# Altium PCB TSE_sensor_commutation_board.PcbDoc
Units mm, origin at the board's own origin, x right, y up, seen from the top; angles counter-clockwise.
Board outline 133.4 x 157 mm, 2 copper layers (Top Layer, Bottom Layer), stack 1.47 mm thick; 54 components, 33 nets, 206 pads, 75 vias.
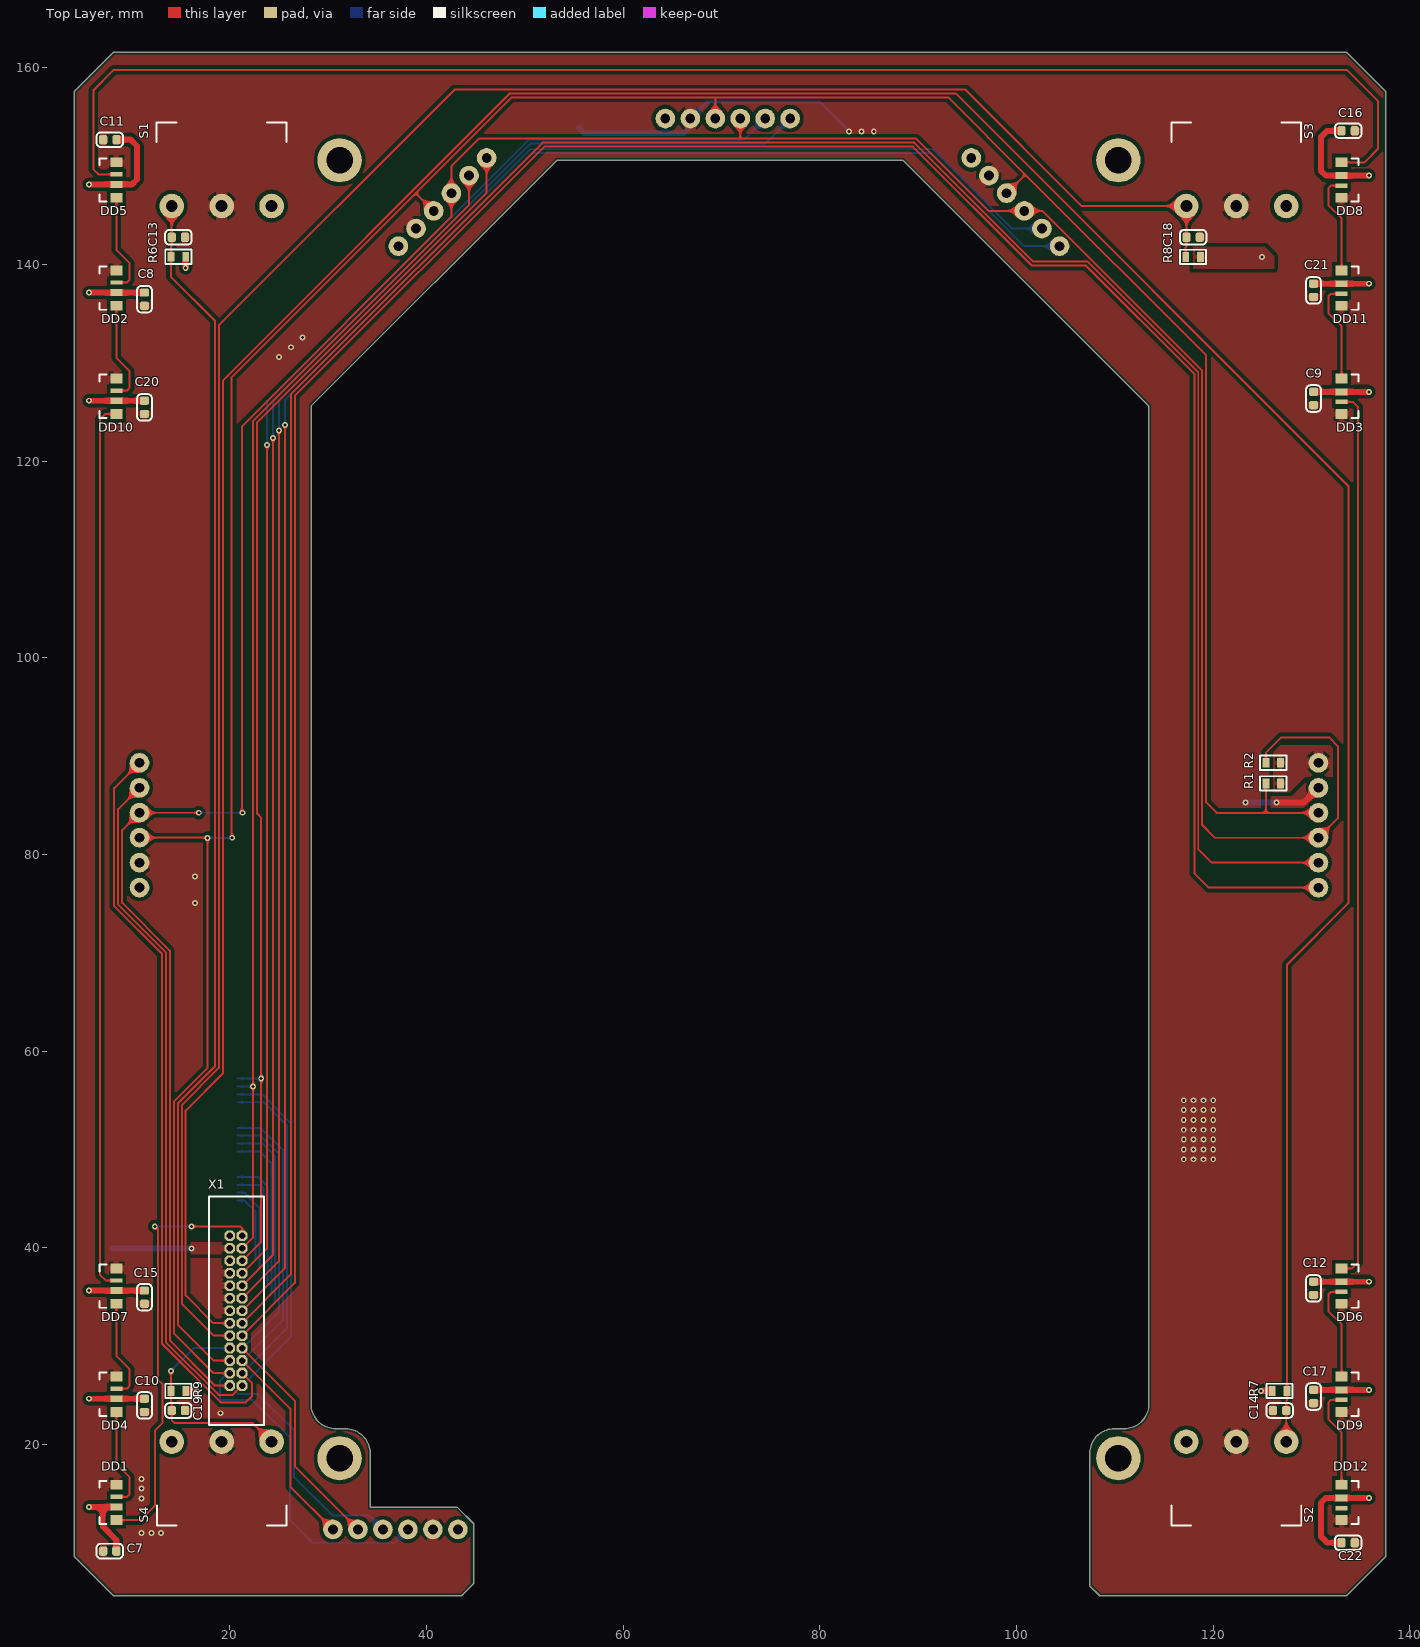
[diagram p0: Top Layer view]
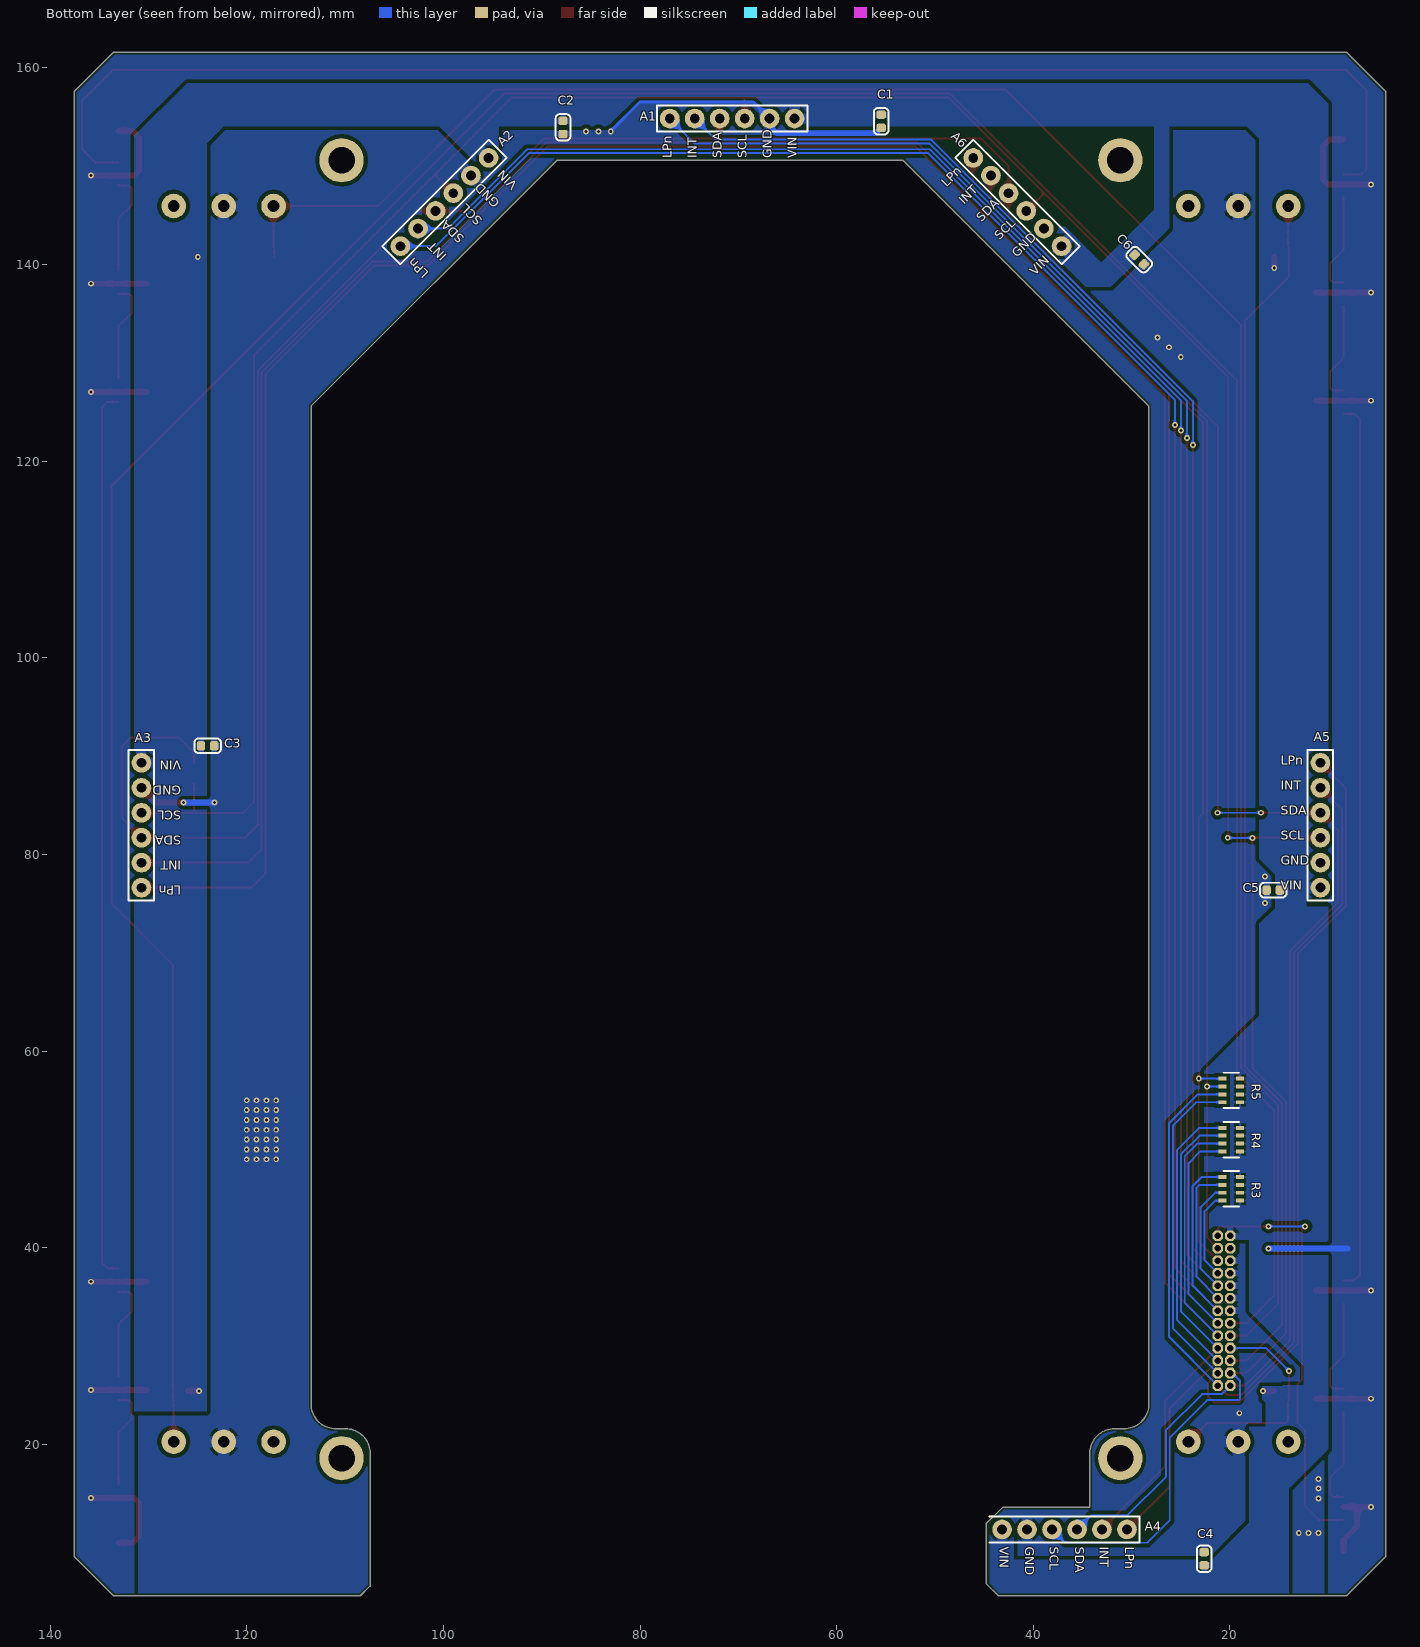
[diagram p1: Bottom Layer view, seen from below]
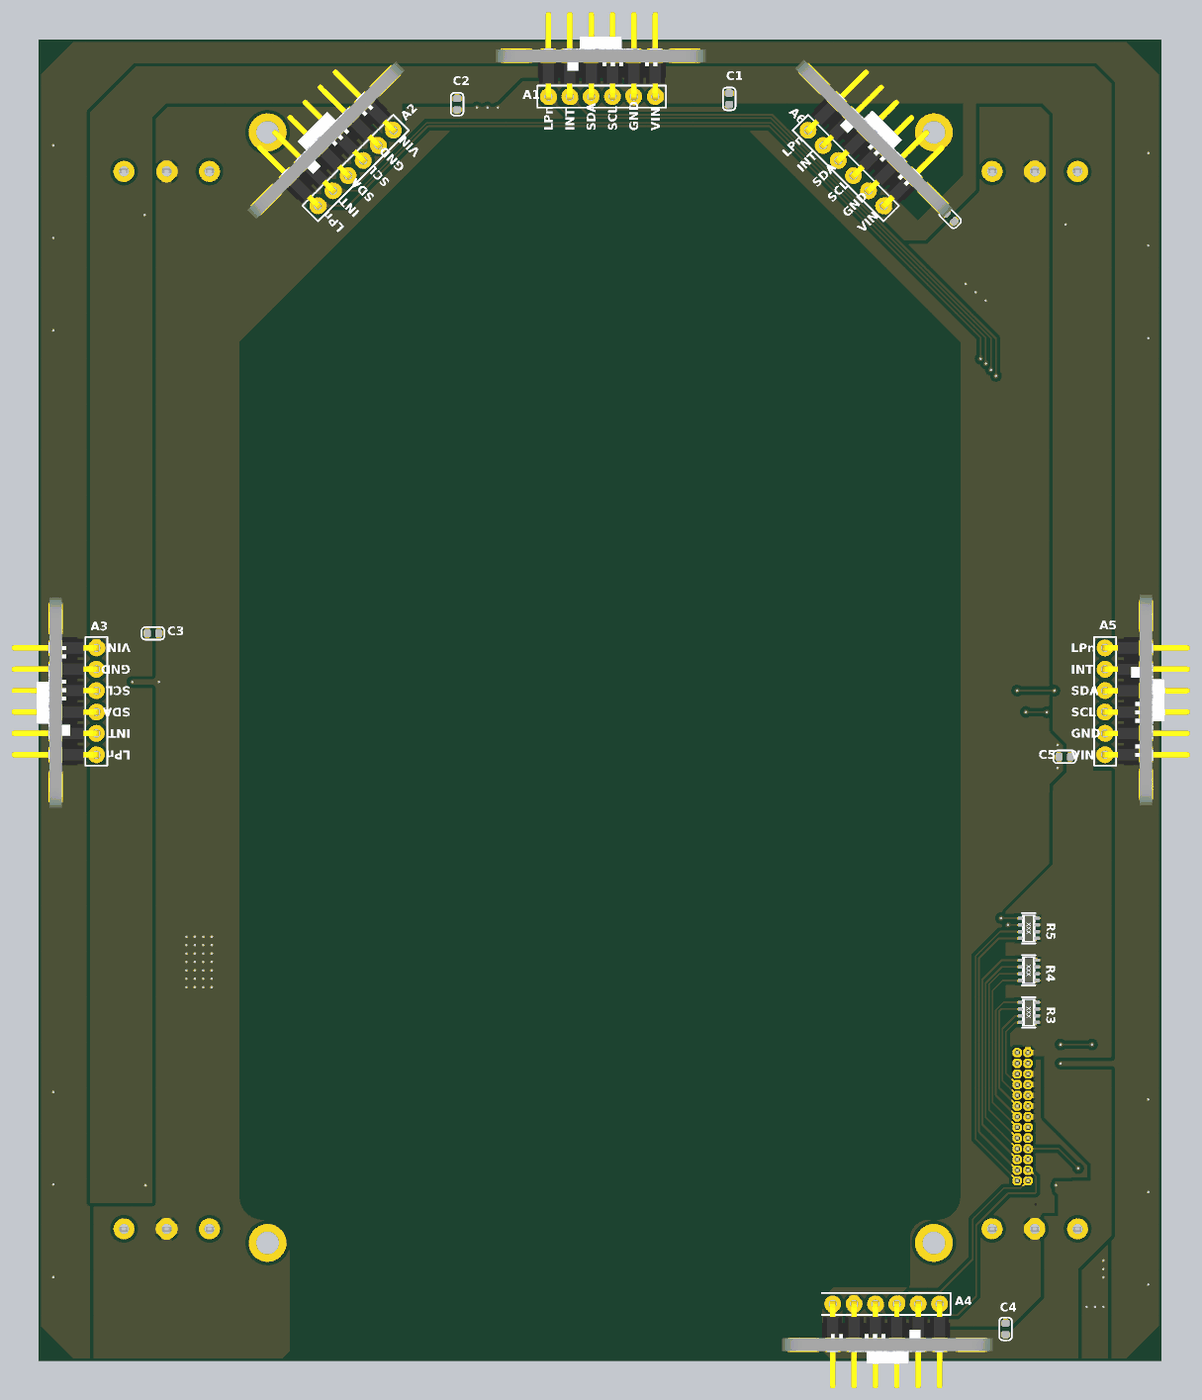
[diagram p2: 3D render of the assembled board from below, using the file's embedded part models]

## Layer stack, top to bottom
Top Solder: solder mask 0.015, Solder Resist, Dk 3.5
Top Layer: signal copper 0.035
Dielectric 1: dielectric 1.4, FR-4, Dk 4.8
Bottom Layer: signal copper 0.035
Bottom Solder: solder mask 0.015, Solder Resist, Dk 3.5

## Board outline
8.15,4.6 4.15,8.6 4.15,157.6 8.15,161.6 133.55,161.6 137.55,157.6 137.55,8.6 133.55,4.6 108.45,4.6 107.45,5.6 107.45,19.1 cw(c109.95,19.1) 109.95,21.6 110.95,21.6 ccw(c110.95,24.1) 113.45,24.1 113.45,125.6 88.45,150.6 53.25,150.6 28.25,125.6 28.25,24.1 ccw(c30.75,24.1) 30.75,21.6 31.75,21.6 cw(c31.75,19.1) 34.25,19.1 34.25,13.6 43.125,13.6 44.8,11.925 44.8,5.85 43.55,4.6

## Design rules (kind name [scope] priority, off if disabled: settings)
AcuteAngle min_acute_angle [OnCopper] p1: minimum=3.50000000000000E+0001 checktracksonly=FALSE // Минимальный угол между примитивами топологии
BoardOutlineClearance board_outline_clearance_std [NOT (OnLayer('Bottom Overlay') OR OnLayer('Top Overlay'))] p1: gap=0.25 ignorepadtopadclearanceinfootprint=FALSE except(0: Arc-SplitContinuation Track-SplitContinuation SMDPad-SplitContinuation THPad-SplitContinuation Via-SplitContinuation Fill-SplitContinuation Poly-SplitContinuation Region-SplitContinuation Text-SplitContinuation) // Отступ элементов топологии от края фрезеруемой печатной платы
Clearance Clearance_1 [InPoly] p1: gap=0.4 ignorepadtopadclearanceinfootprint=FALSE
Clearance clearance_outer_35um_std [OnTopLayer OR OnBottomLayer] p2: gap=0.2 ignorepadtopadclearanceinfootprint=TRUE except(0.25: Arc-Hole Track-Hole SMDPad-Hole THPad-Hole Via-Hole Fill-Hole Poly-Hole Region-Hole Text-Hole) // Зазоры на внешних слоях
Clearance clearance_inner_35um_std [NOT (OnTopLayer Or OnBottomLayer)] p3: gap=0.2 ignorepadtopadclearanceinfootprint=FALSE except(0.25: Arc-Hole Track-Hole SMDPad-Hole THPad-Hole Via-Hole Fill-Hole Poly-Hole Region-Hole Text-Hole) // Зазоры на внутренних слоях
ComponentClearance [All] p1: gap=0 collisioncheckmode=3 verticalgap=0 showdistances=FALSE
DiffPairsRouting diff_pairs_routing [All] p1: maxlimit=0.127 minlimit=0.127 mostfreqgap=0.127 toplayer_minwidth=0.143 toplayer_maxwidth=0.143 toplayer_prefwidth=0.143 bottomlayer_minwidth=0.143 bottomlayer_maxwidth=0.143 bottomlayer_prefwidth=0.143 impedanceprofiledriven=TRUE maxuncoupledlength=12.7 // Правила трассировки дифференциальных пар
HoleSize min_hole_size_std [IsPad] p1: absolutevalues=TRUE maxlimit=5.9 minlimit=0.6 maxpercent=80.000 minpercent=20.000 // Диаметр межслойного переходного отверстия
HoleSize min_hole_size_via_std [IsVia] p2: absolutevalues=TRUE maxlimit=5.9 minlimit=0.3 maxpercent=80.000 minpercent=20.000 // Минимальный диаметр монтажного отверстия
HoleToHoleClearance hole_to_hole_clearance_std [All] p1: gap=0.2 allowstackedmicrovias=FALSE // Минимальное расстояние между краями двух отверстий
MinimumAnnularRing min_via_ar_std [All] p1: minimumring=0.15 // Поясок площадки переходного отверстия (Annular ring VIA)
MinimumAnnularRing min_pad_ar_std [All] p2: minimumring=0.2 // Поясок монтажной контактной площадки (Annular ring PAD)
MinimumSolderMaskSliver min_solder_mask_bridge_std [All] p1: minsoldermaskwidth=0.15 // Мнимальная ширина масочного мостика
PlaneClearance plane_clearance_35um_std [All] p1: clearance=0.2 // Отступ полигона (для слоя plane) от элементов топологии
PlaneConnect [All] p1: planeconnectstyle=Relief reliefexpansion=0.5 reliefentries=4 reliefconductorwidth=0.2 reliefairgap=0.2
PolygonConnect poly_connect_to_pad<=0.3 [(AsMM(PadXSize_AllLayers)<=0.301) or (AsMM(PadYSize_AllLayers)<=0.301)] p1: thpad.connectstyle=Relief thpad.reliefconductorwidth=0.2 thpad.reliefentries=4 thpad.polygonreliefangle="90 Angle" thpad.airgapwidth=0.2 smdpad.connectstyle=Relief smdpad.reliefconductorwidth=0.2 smdpad.reliefentries=4 smdpad.polygonreliefangle="90 Angle" smdpad.airgapwidth=0.2 via.connectstyle=Direct via.reliefconductorwidth=0.254 via.reliefentries=4 via.polygonreliefangle="90 Angle" via.airgapwidth=0.254 // Правила подключения полигонов для падов от 0,3мм и меньше
PolygonConnect poly_connect_to_pad<=0.4 [(AsMM(PadXSize_AllLayers)<=0.401) or (AsMM(PadYSize_AllLayers)<=0.401)] p2: thpad.connectstyle=Relief thpad.reliefconductorwidth=0.26 thpad.reliefentries=4 thpad.polygonreliefangle="90 Angle" thpad.airgapwidth=0.2 smdpad.connectstyle=Relief smdpad.reliefconductorwidth=0.26 smdpad.reliefentries=4 smdpad.polygonreliefangle="90 Angle" smdpad.airgapwidth=0.2 via.connectstyle=Direct via.reliefconductorwidth=0.254 via.reliefentries=4 via.polygonreliefangle="90 Angle" via.airgapwidth=0.254 // Правила подключения полигонов для падов от 0,4 и меньше
PolygonConnect poly_connect_to_pad<=0.6 [(AsMM(PadXSize_AllLayers)<=0.601) or (AsMM(PadYSize_AllLayers)<=0.601)] p3: thpad.connectstyle=Relief thpad.reliefconductorwidth=0.33 thpad.reliefentries=4 thpad.polygonreliefangle="90 Angle" thpad.airgapwidth=0.2 smdpad.connectstyle=Relief smdpad.reliefconductorwidth=0.33 smdpad.reliefentries=4 smdpad.polygonreliefangle="90 Angle" smdpad.airgapwidth=0.2 via.connectstyle=Direct via.reliefconductorwidth=0.254 via.reliefentries=4 via.polygonreliefangle="90 Angle" via.airgapwidth=0.254 // Правила подключения полигонов для падов от 0,6мм и меньше
PolygonConnect poly_connect_to_pad<=0.7 [(AsMM(PadXSize_AllLayers)<=0.701) or (AsMM(PadYSize_AllLayers)<=0.701)] p4: thpad.connectstyle=Relief thpad.reliefconductorwidth=0.46 thpad.reliefentries=4 thpad.polygonreliefangle="90 Angle" thpad.airgapwidth=0.2 smdpad.connectstyle=Relief smdpad.reliefconductorwidth=0.46 smdpad.reliefentries=4 smdpad.polygonreliefangle="90 Angle" smdpad.airgapwidth=0.2 via.connectstyle=Direct via.reliefconductorwidth=0.254 via.reliefentries=4 via.polygonreliefangle="90 Angle" via.airgapwidth=0.254 // Правила подключения полигонов для падов от 0,7мм и меньше
PolygonConnect poly_connect_to_pad<=0.8 [(AsMM(PadXSize_AllLayers)<=0.8)or(AsMM(PadYSize_AllLayers)<=0.8)] p5: thpad.connectstyle=Relief thpad.reliefconductorwidth=0.53 thpad.reliefentries=4 thpad.polygonreliefangle="90 Angle" thpad.airgapwidth=0.3 smdpad.connectstyle=Relief smdpad.reliefconductorwidth=0.53 smdpad.reliefentries=4 smdpad.polygonreliefangle="90 Angle" smdpad.airgapwidth=0.2 via.connectstyle=Direct via.reliefconductorwidth=0.254 via.reliefentries=4 via.polygonreliefangle="90 Angle" via.airgapwidth=0.254 // Правила подключения полигонов для падов от 0,8мм и меньше
PolygonConnect poly_connect_to_pad<=1 [(AsMM(PadXSize_AllLayers)<=1.01)or(AsMM(PadYSize_AllLayers)<=1.01)] p6: thpad.connectstyle=Relief thpad.reliefconductorwidth=0.6 thpad.reliefentries=4 thpad.polygonreliefangle="90 Angle" thpad.airgapwidth=0.3 smdpad.connectstyle=Relief smdpad.reliefconductorwidth=0.6 smdpad.reliefentries=4 smdpad.polygonreliefangle="90 Angle" smdpad.airgapwidth=0.2 via.connectstyle=Direct via.reliefconductorwidth=0.254 via.reliefentries=4 via.polygonreliefangle="90 Angle" via.airgapwidth=0.254 // Правила подключения полигонов для падов от 1мм и меньше
PolygonConnect poly_connect_to_pad<=1.3 [(AsMM(PadXSize_AllLayers)<=1.31)or(AsMM(PadYSize_AllLayers)<=1.31)] p7: thpad.connectstyle=Relief thpad.reliefconductorwidth=0.66 thpad.reliefentries=4 thpad.polygonreliefangle="90 Angle" thpad.airgapwidth=0.3 smdpad.connectstyle=Relief smdpad.reliefconductorwidth=0.86 smdpad.reliefentries=4 smdpad.polygonreliefangle="90 Angle" smdpad.airgapwidth=0.2 via.connectstyle=Direct via.reliefconductorwidth=0.254 via.reliefentries=4 via.polygonreliefangle="90 Angle" via.airgapwidth=0.254 // Правила подключения полигонов для падов от 1,3мм и меньше
PolygonConnect poly_connect_to_pad<=1.6 [(AsMM(PadXSize_AllLayers)<=1.61)or(AsMM(PadYSize_AllLayers)<=1.61)] p8: thpad.connectstyle=Relief thpad.reliefconductorwidth=0.8 thpad.reliefentries=4 thpad.polygonreliefangle="90 Angle" thpad.airgapwidth=0.3 smdpad.connectstyle=Relief smdpad.reliefconductorwidth=1 smdpad.reliefentries=4 smdpad.polygonreliefangle="90 Angle" smdpad.airgapwidth=0.2 via.connectstyle=Direct via.reliefconductorwidth=0.254 via.reliefentries=4 via.polygonreliefangle="90 Angle" via.airgapwidth=0.254 // Правила подключения полигонов для падов от 1,6мм и меньше
PolygonConnect poly_connect_to_pad<=1.8 [(AsMM(PadXSize_AllLayers)<=1.8)or(AsMM(PadYSize_AllLayers)<=1.8)] p9: thpad.connectstyle=Relief thpad.reliefconductorwidth=1 thpad.reliefentries=4 thpad.polygonreliefangle="90 Angle" thpad.airgapwidth=0.3 smdpad.connectstyle=Relief smdpad.reliefconductorwidth=1.2 smdpad.reliefentries=4 smdpad.polygonreliefangle="90 Angle" smdpad.airgapwidth=0.2 via.connectstyle=Direct via.reliefconductorwidth=0.254 via.reliefentries=4 via.polygonreliefangle="90 Angle" via.airgapwidth=0.254 // Правила подключения полигонов для падов от 1,8мм и меньше
PolygonConnect poly_connect_to_pad<=2 [(AsMM(PadXSize_AllLayers)<=2.01)or(AsMM(PadYSize_AllLayers)<=2.01)] p10: thpad.connectstyle=Relief thpad.reliefconductorwidth=1.1 thpad.reliefentries=4 thpad.polygonreliefangle="90 Angle" thpad.airgapwidth=0.3 smdpad.connectstyle=Relief smdpad.reliefconductorwidth=1.4 smdpad.reliefentries=4 smdpad.polygonreliefangle="90 Angle" smdpad.airgapwidth=0.2 via.connectstyle=Direct via.reliefconductorwidth=0.254 via.reliefentries=4 via.polygonreliefangle="90 Angle" via.airgapwidth=0.254 // Правила подключения полигонов для падов от 2мм и меньше
PolygonConnect poly_connect_to_pad<=2.3 [(AsMM(PadXSize_AllLayers)<=2.31)or(AsMM(PadYSize_AllLayers)<=2.31)] p11: thpad.connectstyle=Relief thpad.reliefconductorwidth=1.2 thpad.reliefentries=4 thpad.polygonreliefangle="90 Angle" thpad.airgapwidth=0.3 smdpad.connectstyle=Relief smdpad.reliefconductorwidth=1.4 smdpad.reliefentries=4 smdpad.polygonreliefangle="90 Angle" smdpad.airgapwidth=0.2 via.connectstyle=Direct via.reliefconductorwidth=0.254 via.reliefentries=4 via.polygonreliefangle="90 Angle" via.airgapwidth=0.254 // Правила подключения полигонов для падов от 2,3мм и меньше
PolygonConnect poly_connect_to_pad<=2.5 [(AsMM(PadXSize_AllLayers)<=2.51)or(AsMM(PadYSize_AllLayers)<=2.51)] p12: thpad.connectstyle=Relief thpad.reliefconductorwidth=1.2 thpad.reliefentries=4 thpad.polygonreliefangle="90 Angle" thpad.airgapwidth=0.3 smdpad.connectstyle=Relief smdpad.reliefconductorwidth=1.4 smdpad.reliefentries=4 smdpad.polygonreliefangle="90 Angle" smdpad.airgapwidth=0.2 via.connectstyle=Direct via.reliefconductorwidth=0.254 via.reliefentries=4 via.polygonreliefangle="90 Angle" via.airgapwidth=0.254 // Правила подключения полигонов для падов от 2,5мм и меньше
PolygonConnect poly_connect_to_pad<=2.7 [(AsMM(PadXSize_AllLayers)<=2.71)or(AsMM(PadYSize_AllLayers)<=2.71)] p13: thpad.connectstyle=Relief thpad.reliefconductorwidth=1.4 thpad.reliefentries=4 thpad.polygonreliefangle="90 Angle" thpad.airgapwidth=0.3 smdpad.connectstyle=Relief smdpad.reliefconductorwidth=1.6 smdpad.reliefentries=4 smdpad.polygonreliefangle="90 Angle" smdpad.airgapwidth=0.2 via.connectstyle=Direct via.reliefconductorwidth=0.254 via.reliefentries=4 via.polygonreliefangle="90 Angle" via.airgapwidth=0.254 // Правила подключения полигонов для падов от 2,7мм и меньше
PolygonConnect poly_connect_to_pad<=3 [(AsMM(PadXSize_AllLayers)<=3.01)or(AsMM(PadYSize_AllLayers)<=3.01)] p14: thpad.connectstyle=Relief thpad.reliefconductorwidth=1.6 thpad.reliefentries=4 thpad.polygonreliefangle="90 Angle" thpad.airgapwidth=0.3 smdpad.connectstyle=Relief smdpad.reliefconductorwidth=1.8 smdpad.reliefentries=4 smdpad.polygonreliefangle="90 Angle" smdpad.airgapwidth=0.2 via.connectstyle=Direct via.reliefconductorwidth=0.254 via.reliefentries=4 via.polygonreliefangle="90 Angle" via.airgapwidth=0.254 // Правила подключения полигонов для падов от 3мм и меньше
PolygonConnect poly_connect_to_pad<=7 [(AsMM(PadXSize_AllLayers)<7.01)or(AsMM(PadYSize_AllLayers)<=7.01)] p15: thpad.connectstyle=Relief thpad.reliefconductorwidth=2 thpad.reliefentries=4 thpad.polygonreliefangle="90 Angle" thpad.airgapwidth=0.4 smdpad.connectstyle=Relief smdpad.reliefconductorwidth=2 smdpad.reliefentries=4 smdpad.polygonreliefangle="90 Angle" smdpad.airgapwidth=0.3 via.connectstyle=Direct via.reliefconductorwidth=0.254 via.reliefentries=4 via.polygonreliefangle="90 Angle" via.airgapwidth=0.254 // Правила подключения полигонов для падов от 7мм и меньше
PolygonConnect poly_connect_to_pad [All] p16: thpad.connectstyle=Relief thpad.reliefconductorwidth=0.25 thpad.reliefentries=4 thpad.polygonreliefangle="90 Angle" thpad.airgapwidth=0.2 smdpad.connectstyle=Relief smdpad.reliefconductorwidth=0.25 smdpad.reliefentries=4 smdpad.polygonreliefangle="90 Angle" smdpad.airgapwidth=0.2 via.connectstyle=Direct via.reliefconductorwidth=0.25 via.reliefentries=4 via.polygonreliefangle="90 Angle" via.airgapwidth=0.2 // Правила подключения полигонов общие
RoutingCorners [All] p1 off: cornerstyle=45-Degree minsetback=2.5 maxsetback=2.5
RoutingVias [All] p1: holewidth=0.3 width=0.6 viastyle="Through Hole" minholewidth=0.3 minwidth=0.6 maxholewidth=5.9 maxwidth=6.4
SilkToSilkClearance silk_to_silk_clearance_std [All] p1 off: silktosilkclearance=0.15 // Отступ текста шелкографии от других примитивов шелкографии
SilkToSolderMaskClearance silk_to_solder_mask_clearance_std [IsPad] p1 off: minsilkscreentomaskgap=0.15 clearancetoexposedcopper=FALSE // Минимальное расстояние между элементами шелкографии и вскрытой медью
SolderMaskExpansion solder_mask_expansion_std [All] p1: expansion=0.05 istentingtop=FALSE // Припуск паяльной масски
UnRoutedNet [All] p1: checkbadconnections=TRUE
Width width_35um_std [All] p1: maxlimit=10 minlimit=0.2 preferedwidth=0.2 checkconnectedcopper=TRUE // Ширина проводников (общая)
19 further rules are at their usual default settings.

## Components (designator, comment, footprint, x,y, rotation, side; value= is the part's Value field where it differs from the comment)
A1 "VL53L4CD" VL53L4CD 70.625,154.85 r180 bottom
A2 "VL53L4CD" VL53L4CD 99.885,146.356 r135 bottom
A3 "VL53L4CD" VL53L4CD 130.702,82.971 r90 bottom
A4 "VL53L4CD" VL53L4CD 36.825,11.35 r0 bottom
A5 "VL53L4CD" VL53L4CD 10.8,82.975 r270 bottom
A6 "VL53L4CD" VL53L4CD 41.617,146.352 r225 bottom
C1 "0,1мк" C0603 55.475,154.575 r90 bottom
C2 "0,1мк" C0603 87.825,153.95 r90 bottom
C3 "0,1мк" C0603 123.975,91.05 r0 bottom
C4 "0,1мк" C0603 22.625,8.375 r270 bottom
C5 "0,1мк" C0603 15.6,76.375 r180 bottom
C6 "0,1мк" C0603 29.225,140.5 r45 bottom
C7 "0,1мк" C0603 7.771,9.15 r0 top
C8 "0,1мк" C0603 11.3,136.475 r90 top
C9 "0,1мк" C0603 130.2,126.375 r90 top
C10 "0,1мк" C0603 11.3,23.975 r90 top
C11 "0,1мк" C0603 7.775,152.7 r0 top
C12 "0,1мк" C0603 130.2,35.875 r90 top
C13 "0,1мк" C0603 14.75,142.775 r180 top
C14 "0,1мк" C0603 126.75,23.45 r0 top
C15 "0,1мк" C0603 11.3,34.975 r90 top
C16 "0,1мк" C0603 133.725,153.6 r180 top
C17 "0,1мк" C0603 130.2,24.875 r90 top
C18 "0,1мк" C0603 117.95,142.775 r180 top
C19 "0,1мк" C0603 14.75,23.45 r180 top
C20 "0,1мк" C0603 11.3,125.475 r90 top
C21 "0,1мк" C0603 130.2,137.375 r90 top
C22 "0,1мк" C0603 133.725,10 r180 top
DD1 "SK6812" SK6812-SIDE-A 8.45,14.1 r90 top
DD2 "SK6812" SK6812-SIDE-A 8.45,137.6 r90 top
DD3 "SK6812" SK6812-SIDE-A 133.05,126.6 r270 top
DD4 "SK6812" SK6812-SIDE-A 8.45,25.1 r90 top
DD5 "SK6812" SK6812-SIDE-A 8.45,148.6 r90 top
DD6 "SK6812" SK6812-SIDE-A 133.05,36.1 r270 top
DD7 "SK6812" SK6812-SIDE-A 8.45,36.1 r90 top
DD8 "SK6812" SK6812-SIDE-A 133.05,148.6 r270 top
DD9 "SK6812" SK6812-SIDE-A 133.05,25.1 r270 top
DD10 "SK6812" SK6812-SIDE-A 8.45,126.6 r90 top
DD11 "SK6812" SK6812-SIDE-A 133.05,137.6 r270 top
DD12 "SK6812" SK6812-SIDE-A 133.05,14.1 r270 top
R1 "2,4к" R0603 126.1,87.225 r0 top
R2 "2,4к" R0603 126.1,89.325 r0 top
R3 "10к" R0603x4 19.875,46 r270 bottom
R4 "10к" R0603x4 19.875,51 r270 bottom
R5 "10к" R0603x4 19.875,56 r270 bottom
R6 "10к" R0603 14.745,140.785 r0 top
R7 "10к" R0603 126.75,25.44 r180 top
R8 "10к" R0603 117.95,140.775 r0 top
R9 "10к" R0603 14.745,25.44 r0 top
S1 "KW10-Z1P" KW10-Z1P 19.15,145.95 r0 top
S2 "KW10-Z1P" KW10-Z1P 122.345,20.275 r180 top
S3 "KW10-Z1P" KW10-Z1P 122.345,145.95 r0 top
S4 "KW10-Z1P" KW10-Z1P 19.15,20.275 r180 top
X1 "IDC_26" IDC1.27_26 20.601,33.602 r90 top

## Footprints (in the part's own frame and the unit in brackets; to place one, negate y for a bottom-side part, rotate by r counter-clockwise, add the part's x,y. Pads: shape width x height; smd on the part's side, far side on the other; paste and mask are expansions set on the pad)
C0603 [mm] "Chip Capacitor, 2-Leads, Body 1,60x0,80mm, IPC Medium Density"
  rrect50% 0.85x0.95 smd: 1(-0.675,0) 2(0.675,0)
  Top Layer pour cut-out: -0.254,0.5 -0.254,-0.5 0.254,-0.5 0.254,0.5
  silkscreen extent -1.35,-0.75 1.35,0.75, body extent -0.85,-0.45 0.85,0.45, height 0.9
IDC1.27_26 [mm] "Разъем - 26 конт. прямая вилка на плату с шагом 1.27мм"
  oct 1.1x1.1 hole 0.65: 1(-7.62,-0.635) 2(-7.62,0.635) 3(-6.35,-0.635) 4(-6.35,0.635) 5(-5.08,-0.635) 6(-5.08,0.635) 7(-3.81,-0.635) 8(-3.81,0.635) 9(-2.54,-0.635) 10(-2.54,0.635) 11(-1.27,-0.635) 12(-1.27,0.635) 13(0,-0.635) 14(0,0.635) 15(1.27,-0.635) 16(1.27,0.635) 17(2.54,-0.635) 18(2.54,0.635) 19(3.81,-0.635) 20(3.81,0.635) 21(5.08,-0.635) 22(5.08,0.635) 23(6.35,-0.635) 24(6.35,0.635) 25(7.62,-0.635) 26(7.62,0.635)
  silkscreen extent -11.61,-2.85 11.63,2.75, body extent -11.4,-2.65 11.41,2.55, height 5.4
KW10-Z1P [mm]
  round 2.5 hole 1.2: 1(-5.08,0) 2(0,0) 3(5.08,0)
  silkscreen extent -6.61,6.5 6.6,8.5, body extent -6.4,-0.2 7.54,12.66, height 5.8
R0603 [mm]
  rect 0.7x1 smd: 1(-0.75,0) 2(0.75,0)
  silkscreen extent -1.33,-0.73 1.33,0.73, body extent -0.8,-0.43 0.8,0.43, height 0.45
R0603x4 [mm] "резисторная сбоорка 0603"
  rect 0.4x0.8 smd: 1(-1.2,0.9) 2(-1.2,-0.9) 3(-0.4,0.9) 4(-0.4,-0.9) 5(0.4,0.9) 6(0.4,-0.9) 7(1.2,0.9) 8(1.2,-0.9)
  silkscreen extent -1.8,-0.8 1.8,0.8, body extent -1.6,-0.8 1.6,0.8, height 0.45
SK6812-SIDE-A [mm]
  rect 1x1.2 smd: 1(-1.8,0) 4(1.8,0)
  rect 0.7x1.2 smd: 2(-0.45,0)
  rect 0.45x1.2 smd: 3(0.575,0)
  silkscreen extent -2.2,1.02 2.2,1.73, body extent -2,-0.07 2,1.53, height 2
VL53L4CD [mm]
  round 2 hole 1: 1(6.35,0) 2(3.81,0) 3(1.27,0) 4(-1.27,0) 5(-3.81,0) 6(-6.35,0)
  silkscreen extent -7.64,-1.3 7.64,1.3, body extent -12.65,-0.33 12.35,10.03, height 10.45

## Part data
A1 A2 A3 A4 A5 A6: "Лазерный дальномер", Наименование=VL53L4CD
C1 C2 C3 C4 C5 C6 C7 C8 C9 C10 C11 C12 C13 C14 C15 C16 C17 C18 C19 C20 C21 C22: library part CC0603JPX7R9BB104, "Конденсатор кер. 0,1мкФ 50В", Manufacturer=Yageo, Name=CC0603JPX7R9BB104, TKE=X7R
DD1 DD2 DD3 DD4 DD5 DD6 DD7 DD8 DD9 DD10 DD11 DD12: "RGB-светодиод с боковым свечнием", Наименование=SK6812
R1 R2: library part RC0603FR-072K4L, "Резистор 2,4 кОм 0,1Вт 1%"
R3 R4 R5: library part RA-4_0.063W, "Резисторная сборка 0,063Вт", Номинал=10к
R6 R7 R8 R9: library part RC0603FR-0710KL, "Резистор 10кОм 0,063Вт 1%", Manufacturer=YAGEO, Tolerance=1%, Name=RC0603FR-0710KL
S1 S2 S3 S4: "концевик", Name=KW10-Z1P
X1: "Разъем - 26 конт. прямая вилка на плату", Contact_1=VL5_INT, Contact_2=SDA, Contact_3=VL5_LPn, Contact_4=SCL, Contact_5=VL4_LPn, Contact_6=SWITCH_FL, Contact_7=VL4_INT, Contact_8=SWITCH_BL, Contact_9=VL3_LPn, Contact_10=SWITCH_FR, Contact_11=VL3_INT, Contact_12=SWITCH_BR, Contact_13=VL2_LPn, Contact_14=GND, Contact_15=VL2_INT, Contact_16=GND, Contact_17=VL1_LPn, Contact_18=GND, Contact_19=VL1_INT, Contact_20=GND, Contact_21=VL6_LPn, Contact_22=GND, Contact_23=VL6_INT, Contact_24=+5В, Contact_25=LED_DIN, Contact_26=+3,3В, Наименование=IDC_26

## Free pads (board coordinates)
  round 4.5 hole 2.7: 0(31.15,18.6) 0(31.15,150.6) 0(110.35,18.6) 0(110.35,150.6)

## Via types
v1: diameter 0.6, hole 0.3, Top Layer to Bottom Layer, tented both sides, 75 vias

## Nets (pads, with @x,y where several pads share a name; then routed paths per layer and width w, separated by ;. In a path a pad name is that pad's centre, name@x,y a point inside that pad or via, vN(x,y) a via of type N, cw(c..) or ccw(c..) an arc to the next point about the centre after c; other vN are vias at no path point)
+3,3В: A1.1 A2.1 A3.1 A4.1 A5.1 A6.1 C1.2 C2.2 C3.2 C4.2 C5.2 C6.2 R1.2 R2.2 R3.1 R3.3 R3.5 R3.7 R4.1 R4.3 R4.5 R4.7 R5.1 R5.3 R5.5 R5.7 R6.2 R7.2 R8.2 R9.2 X1.26 | length 3.4
  Top Layer w0.6: R9.2 v1(16.63,25.44) ; v1(15.495,139.65) R6.2 ; v1(124.865,25.44) R7.2
  other v1: 124.975,140.775
+5В: C7.2 C8.2 C9.2 C10.2 C11.2 C12.2 C15.2 C16.2 C17.2 C20.2 C21.2 C22.2 DD1.2 DD2.2 DD3.2 DD4.2 DD5.2 DD6.2 DD7.2 DD8.2 DD9.2 DD10.2 DD11.2 DD12.2 X1.24 | length 93.5
  Top Layer w0.6: v1(5.675,13.65) 7.062,13.65 ; v1(5.675,24.65) DD4.2 C10.2 ; v1(5.675,35.65) DD7.2 C15.2 ; v1(5.675,126.15) DD10.2 C20.2 ; v1(5.675,137.15) DD2.2 C8.2 ; v1(5.675,148.15) DD5.2 10.05,148.15 10.55,148.65 10.55,152.05 9.9,152.7 C11.2 ; C7.2 8.446,10.279 7.062,11.663 7.062,13.65 ; DD1.2 7.062,13.65 ; C17.2 DD9.2 v1(135.825,25.55) ; C12.2 DD6.2 v1(135.825,36.55) ; C9.2 DD3.2 v1(135.825,127.05) ; C21.2 DD11.2 v1(135.825,138.05) ; C22.2 131.6,10 130.95,10.65 130.95,14.05 131.45,14.55 DD12.2 v1(135.825,14.55) ; C16.2 131.6,153.6 130.95,152.95 130.95,149.55 131.45,149.05 DD8.2 v1(135.825,149.05)
  Bottom Layer w0.6: 8.05,39.9 8.075,39.925 v1(16.096,39.925)
GND: A1.2 A2.2 A3.2 A4.2 A5.2 A6.2 C1.1 C2.1 C3.1 C4.1 C5.1 C6.1 C7.1 C8.1 C9.1 C10.1 C11.1 C12.1 C13.1 C14.1 C15.1 C16.1 C17.1 C18.1 C19.1 C20.1 C21.1 C22.1 DD1.4 DD2.4 DD3.4 DD4.4 DD5.4 DD6.4 DD7.4 DD8.4 DD9.4 DD10.4 DD11.4 DD12.4 S1.2 S2.2 S3.2 S4.2 X1.14 X1.16 X1.18 X1.20 X1.22 | length 38.8
  Top Layer w0.6: v1(126.425,85.275) 129.196,85.275 A3.2
  Bottom Layer w0.3: A1.2 68.49,156.525 80,156.525 v1(82.975,153.55)
  Bottom Layer w0.6: C1.1 55.525,153.9 55.65,153.775 55.65,153.725 56.025,153.35 66.125,153.35 66.547,153.772 66.547,154.582 A1.2 ; v1(123.275,85.275) v1(126.425,85.275)
  other v1: 11,11 12,11 13,11 11,14.5 11,15.5 11,16.5 19.05,23.175 117,49 118,49 119,49 120,49 117,50 118,50 119,50 120,50 117,51 118,51 119,51 120,51 117,52 118,52 119,52 120,52 117,53 118,53 119,53 120,53 117,54 118,54 119,54 120,54 117,55 118,55 119,55 120,55 16.45,75.05 16.45,77.775 25,130.6 26.187,131.587 27.375,132.575 84.225,153.55 85.475,153.55
LED_DIN: DD1.1 X1.25 | length 43.3
  Top Layer w0.2: DD1.1 10.9,12.3 12.35,13.75 12.35,21.4 13.15,22.2 13.15,26.1 12.675,26.575 12.675,41.85 v1(12.35,42.175) ; v1(16.096,42.175) 21.047,42.175 21.236,41.986 X1.25
  Bottom Layer w0.2: v1(12.35,42.175) v1(16.096,42.175)
LED_DO4_DIN5: DD2.1 DD10.3 | length 10.4
  Top Layer w0.2: DD10.3 9.525,127.175 9.8,127.45 9.8,129.15 8.45,130.5 DD2.1
LED_DO8_DIN9: DD3.1 DD11.3 | length 10.4
  Top Layer w0.2: DD3.1 133.05,133.7 131.7,135.05 131.7,136.75 131.975,137.025 DD11.3
NetDD1_3: DD1.3 DD4.1 | length 10.4
  Top Layer w0.2: DD1.3 9.525,14.675 9.8,14.95 9.8,16.65 8.45,18 DD4.1
NetDD2_3: DD2.3 DD5.1 | length 10.4
  Top Layer w0.2: DD2.3 9.525,138.175 9.8,138.45 9.8,140.15 8.45,141.5 DD5.1
NetDD3_3: DD3.3 DD6.1 | length 90.8
  Top Layer w0.2: DD6.1 134.125,37.9 134.725,38.5 134.725,125.5 134.2,126.025 DD3.3
NetDD4_3: DD4.3 DD7.1 | length 10.4
  Top Layer w0.2: DD4.3 9.525,25.675 9.8,25.95 9.8,27.65 8.45,29 DD7.1
NetDD5_3: DD5.3 DD8.1 | length 152.6
  Top Layer w0.2: DD5.3 6.625,149.175 6.1,149.7 6.1,157.7 8.2,159.8 133.6,159.8 136.75,156.65 136.75,151.75 135.4,150.4 DD8.1
NetDD6_3: DD6.3 DD9.1 | length 10.4
  Top Layer w0.2: DD9.1 133.05,32.2 131.7,33.55 131.7,35.25 131.975,35.525 DD6.3
NetDD7_3: DD7.3 DD10.1 | length 90.8
  Top Layer w0.2: DD7.3 7.375,36.675 6.775,37.275 6.775,124.275 7.3,124.8 DD10.1
NetDD8_3: DD8.3 DD11.1 | length 10.4
  Top Layer w0.2: DD11.1 133.05,144.7 131.7,146.05 131.7,147.75 131.975,148.025 DD8.3
NetDD9_3: DD9.3 DD12.1 | length 10.4
  Top Layer w0.2: DD12.1 133.05,21.2 131.7,22.55 131.7,24.25 131.975,24.525 DD9.3
SCL: A1.3 A2.3 A3.3 A4.3 A5.3 A6.3 R1.1 X1.4 | length 338.7
  Top Layer w0.2: A5.3@10.803,81.705 17.695,81.705 v1(17.725,81.675) 17.725,58.297 14.284,54.856 14.284,31.291 18.323,27.252 X1.4 ; v1(20.225,81.7) 20.175,81.75 20.175,128.532 38.908,147.265 ; A6.3 38.908,147.265 ; A1.3 69.355,156.995 69.35,157 ; A2.3 100.881,149.148 ; R1.1 125.35,84.241 ; A3.3 125.35,84.241 ; 38.908,147.265 48.643,157 69.35,157 ; 69.35,157 93.029,157 100.881,149.148 ; 100.881,149.148 119.275,130.754 119.275,85.3 120.334,84.241 125.35,84.241
  Bottom Layer w0.2: v1(17.725,81.675) 17.737,81.687 20.212,81.687 v1(20.225,81.7) ; X1.4 19.752,27.252 19,26.5 19,24.617 19.117,24.5 22.317,24.5 26.125,20.692 26.125,12.267 28.392,10 36.745,10 A4.3
SDA: A1.4 A2.4 A3.4 A4.4 A5.4 A6.4 R2.1 X1.2 | length 341.3
  Top Layer w0.2: v1(16.825,84.245) A5.4 9.025,82.47 9.025,75.075 13.884,70.216 13.884,30.572 18.474,25.982 X1.2 ; v1(21.258,84.245) 21.2,84.303 21.2,123.525 42.515,144.84 A6.4 42.515,150.015 45.3,152.8 71.895,152.8 ; A1.4 71.895,152.8 ; R2.1 125.35,90.35 126.9,91.9 131.775,91.9 132.675,91 132.675,83.674 A3.4 120.174,81.701 118.875,83 118.875,129.204 102.621,145.458 A2.4 97.117,145.458 89.775,152.8 71.895,152.8
  Bottom Layer w0.2: v1(16.825,84.245) v1(21.258,84.245) ; X1.2 20.838,25.11 22.838,25.11 26.525,21.423 26.525,16.675 30.425,12.775 34.13,12.775 A4.4
SWITCH_BL: C19.2 R9.1 S4.1 X1.8 | length 23.5
  Top Layer w0.2: v1(14,27.475) 13.995,27.47 R9.1 13.995,24.43 14.075,24.35 C19.2 14.075,22.475 14.375,22.175 22.33,22.175 S4.1
  Bottom Layer w0.2: v1(14,27.475) 16.317,29.792 X1.8 ; S4.1@23.775,20.275 S4.1
SWITCH_BR: C14.2 R7.1 S2.1 X1.12 | length 343.2
  Top Layer w0.2: X1.12 18.318,32.332 15.496,35.154 15.496,53.945 19.275,57.724 19.275,128.198 48.477,157.4 93.825,157.4 133.75,117.475 133.75,75.05 127.5,68.8 R7.1 127.5,24.5 127.425,24.425 C14.2 S2.1
SWITCH_FL: C13.2 R6.1 S1.1 X1.6 | length 124
  Top Layer w0.2: S1.1 14.073,145.947 14.073,142.777 C13.2 14.075,141.9 13.995,141.82 R6.1 13.995,138.753 18.475,134.273 18.475,58.455 14.696,54.675 14.696,32.154 18.328,28.522 X1.6
SWITCH_FR: C18.2 R8.1 S3.1 X1.10 | length 225.7
  Top Layer w0.2: X1.10 18.338,31.062 15.096,34.304 15.096,54.51 18.875,58.289 18.875,133.833 42.842,157.8 94.8,157.8 106.65,145.95 S3.1 ; R8.1 117.2,141.73 117.275,141.805 C18.2 S3.1@117.275,145.94
VL1_INT: A1.5 R3.8 X1.19 | length 161.4
  Top Layer w0.2: X1.19 23.775,39.951 v1(23.775,121.65)
  Bottom Layer w0.2: R3.8 21.475,44.8 22.598,43.677 22.598,38.774 X1.19 ; v1(23.775,121.65) 23.775,126.1 50.375,152.7 72.285,152.7 A1.5
VL1_LPn: A1.6 R3.6 X1.17 | length 167.3
  Top Layer w0.2: X1.17 24.375,39.281 v1(24.375,122.376)
  Bottom Layer w0.2: R3.6 21.475,45.6 22.998,44.077 22.998,37.904 X1.17 ; v1(24.375,122.376) 24.375,126.134 50.541,152.3 74.425,152.3 A1.6
VL2_INT: A2.5 R3.4 X1.15 | length 199.3
  Top Layer w0.2: X1.15 24.975,38.611 v1(24.975,123.113)
  Bottom Layer w0.2: R3.4 23.116,46.4 23.398,46.118 23.398,37.034 X1.15 ; v1(24.975,123.113) 25,123.138 25,126.194 50.281,151.475 50.531,151.725 91.475,151.725 91.725,151.475 99.538,143.662 A2.5
VL2_LPn: A2.6 R3.2 X1.13 | length 204.7
  Top Layer w0.2: X1.13 25.61,37.976 25.61,123.678 v1(25.6,123.688)
  Bottom Layer w0.2: R3.2 22.881,47.2 23.798,46.283 23.798,36.164 X1.13 ; v1(25.6,123.688) 25.6,126.228 50.697,151.325 91.309,151.325 100.768,141.866 A2.6
VL3_INT: A3.5 R4.8 X1.11 | length 291.8
  Top Layer w0.2: X1.11 26.2,37.296 26.2,126.806 51.794,152.4 89.609,152.4 101.709,140.3 107.214,140.3 118.475,129.039 118.475,80.525 119.839,79.161 A3.5
  Bottom Layer w0.2: R4.8 23,49.8 24.198,48.602 24.198,35.294 X1.11
VL3_LPn: A3.6 R4.6 X1.9 | length 297.4
  Top Layer w0.2: X1.9 26.6,36.426 26.6,126.641 51.959,152 89.444,152 101.544,139.9 107.048,139.9 118.075,128.873 118.075,78.075 119.529,76.621 A3.6
  Bottom Layer w0.2: R4.6 23.325,50.6 24.598,49.327 24.598,34.424 X1.9
VL4_INT: A4.5 R4.4 X1.7 | length 49.6
  Top Layer w0.2: X1.7 26.6,24.428 26.6,17.765 A4.5
  Bottom Layer w0.2: R4.4 23.091,51.4 24.998,49.493 24.998,33.554 X1.7
VL4_LPn: A4.6 R4.2 X1.5 | length 49.7
  Top Layer w0.2: X1.5 26.15,23.608 26.15,15.675 A4.6
  Bottom Layer w0.2: R4.2 23.1,52.2 25.398,49.902 25.398,32.684 X1.5
VL5_INT: A5.5 R5.6 X1.1 | length 105
  Top Layer w0.2: A5.5 8.625,84.61 8.625,74.909 13.484,70.05 13.484,30.406 18.844,25.046 20.3,25.046 X1.1
  Bottom Layer w0.2: R5.6 23.275,55.6 26.198,52.677 26.198,30.944 X1.1
VL5_LPn: A5.6 R5.8 X1.3 | length 109.9
  Top Layer w0.2: A5.6 8.225,86.75 8.225,74.744 13.084,69.885 13.084,30.241 19.05,24.275 21.625,24.275 22.225,24.875 22.225,26.263 X1.3
  Bottom Layer w0.2: R5.8 23.425,54.8 25.798,52.427 25.798,31.814 X1.3
VL6_INT: A6.5 R5.4 X1.23 | length 120.2
  Top Layer w0.2: X1.23 22.35,41.066 22.35,124.109 44.311,146.071 A6.5
  Bottom Layer w0.2: R5.4 v1(22.35,56.4)
VL6_LPn: A6.6 R5.2 X1.21 | length 125.2
  Top Layer w0.2: X1.21 23.175,40.621 23.175,57.076 v1@23.237,57.138 ; v1(23.175,57.2) 23.175,83.742 22.75,84.167 22.75,123.944 46.107,147.301 A6.6
  Bottom Layer w0.2: R5.2 v1(23.175,57.2)
pads on no net: DD12.3 S1.3 S2.3 S3.3 S4.3

## Polygon pours and split planes (outlines as drawn)
GND on Bottom Layer "NONET_L-01_P-001" (solid, remove dead copper, pour order 9): 8.05,4.6 4.05,8.6 4.05,157.6 8.05,161.6 133.45,161.6 137.45,157.6 137.45,8.6 133.45,4.6 108.35,4.6 107.35,5.6 107.35,19.1 cw(c109.85,19.1) 109.85,21.6 110.85,21.6 ccw(c110.85,24.1) 113.35,24.1 113.35,125.6 88.35,150.6 53.15,150.6 28.15,125.6 28.15,24.1 ccw(c30.65,24.1) 30.65,21.6 31.65,21.6 cw(c31.65,19.1) 34.15,19.1 34.15,13.6 43.45,13.6 44.45,12.6 44.45,5.6 43.45,4.6
+3,3В on Bottom Layer "bbb" (solid, remove dead copper, pour order 1): 17.025,79.575 15.396,77.946 15.396,74.554 17,72.95 17.025,71.3 17.025,63.573 22.598,58 22.598,40.8 18.025,40.8 18.025,33.525 12.5,28 12.5,26 14.637,26 14.697,25.94 16.729,25.94 16.729,24.617 16.375,24.262 16.375,21.775 18.025,21.775 18.025,12.05 21.8,8.275 42,8.275 42,13.55 41.95,13.6 43.45,13.6 44.45,12.6 44.45,5.6 43.45,4.6 14,4.6 14,15.485 10.025,19.5 10.025,39.35 15.325,39.35 15.325,40.55 10.025,40.55 10.025,74.7 12.225,74.7 12.225,75.525 12.2,75.55 10.025,75.55 10.025,155.825 10.025,156.375 12.04,158.425 126.075,158.425 131.45,153.05 131.45,23.35 124.075,23.35 124.075,152.325 122.35,154.05 100.414,154.05 96.066,149.701 94.35,151.417 94.35,154.05 27.7,154.05 27.7,145.55 33.075,140.175 36.756,143.856 37.419,143.856 37.419,143.531 38.975,141.975 34.725,137.725 32.125,137.725 26.175,143.675 26.175,154.05 18.275,154.05 17.025,152.8
+5В on Bottom Layer "+5В_L02_P002" (solid, remove dead copper, pour order 2): 126.925,157.825 131.45,153.3 131.45,4.6 133.45,4.6 137.45,8.6 137.45,157.6 133.45,161.6 8.05,161.6 4.05,157.6 4.05,8.6 8.05,4.6 10.025,4.6 10.025,39.35 16.596,39.35 16.596,40.55 10.025,40.55 10.025,156.375 11.475,157.825
GND on Top Layer "NONET_L-01_P-001" (solid, remove dead copper, pour order 10): 8.05,4.6 4.05,8.6 4.05,157.6 8.05,161.6 133.45,161.6 137.45,157.6 137.45,8.6 133.45,4.6 108.35,4.6 107.35,5.6 107.35,19.1 cw(c109.85,19.1) 109.85,21.6 110.85,21.6 ccw(c110.85,24.1) 113.35,24.1 113.35,125.6 88.35,150.6 53.15,150.6 28.15,125.6 28.15,24.1 ccw(c30.65,24.1) 30.65,21.6 31.65,21.6 cw(c31.65,19.1) 34.15,19.1 34.15,13.6 43.45,13.6 44.45,12.6 44.45,5.6 43.45,4.6
+5В on Top Layer "+5В_L01_P006" (solid, remove dead copper, pour order 6): 14.075,39.35 22.6,39.35 22.6,40.55 14.075,40.55
+3,3В on Top Layer "NONET_L-01_P-001" (solid, remove dead copper, pour order 0): 126.1,91.1 131.95,91.1 132.475,90.575 132.475,87.9 129.375,87.9 127.8,86.325 126.1,86.325
+3,3В on Top Layer "+3,3В_L01_P008" (solid, remove dead copper, pour order 8): 117.95,141.8 125.25,141.8 126.2,140.85 126.2,139.55 117.95,139.55

## Silkscreen, mask and mechanical layers (free items; w line width, h text height)
Top Solder:
  region: 19.35,25.675 19.35,41.55 19.675,41.875 21.6,41.875 21.9,41.575 21.9,25.7 21.575,25.375 19.65,25.375
Bottom Solder:
  region: 19.35,25.675 19.35,41.55 19.675,41.875 21.6,41.875 21.9,41.575 21.9,25.7 21.575,25.375 19.65,25.375
Mechanical 1:
  the board outline again, w0.2